# Altium PCB A313_4.PcbDoc (part 1 of 3)
Units mm, origin at the board's own origin, x right, y up, seen from the top; angles counter-clockwise.
Board outline 230 x 157 mm, 2 copper layers (Top Layer, Bottom Layer); 244 components, 187 nets, 1242 pads, 1093 vias.
Unrouted connection lines stored in the file: 1.
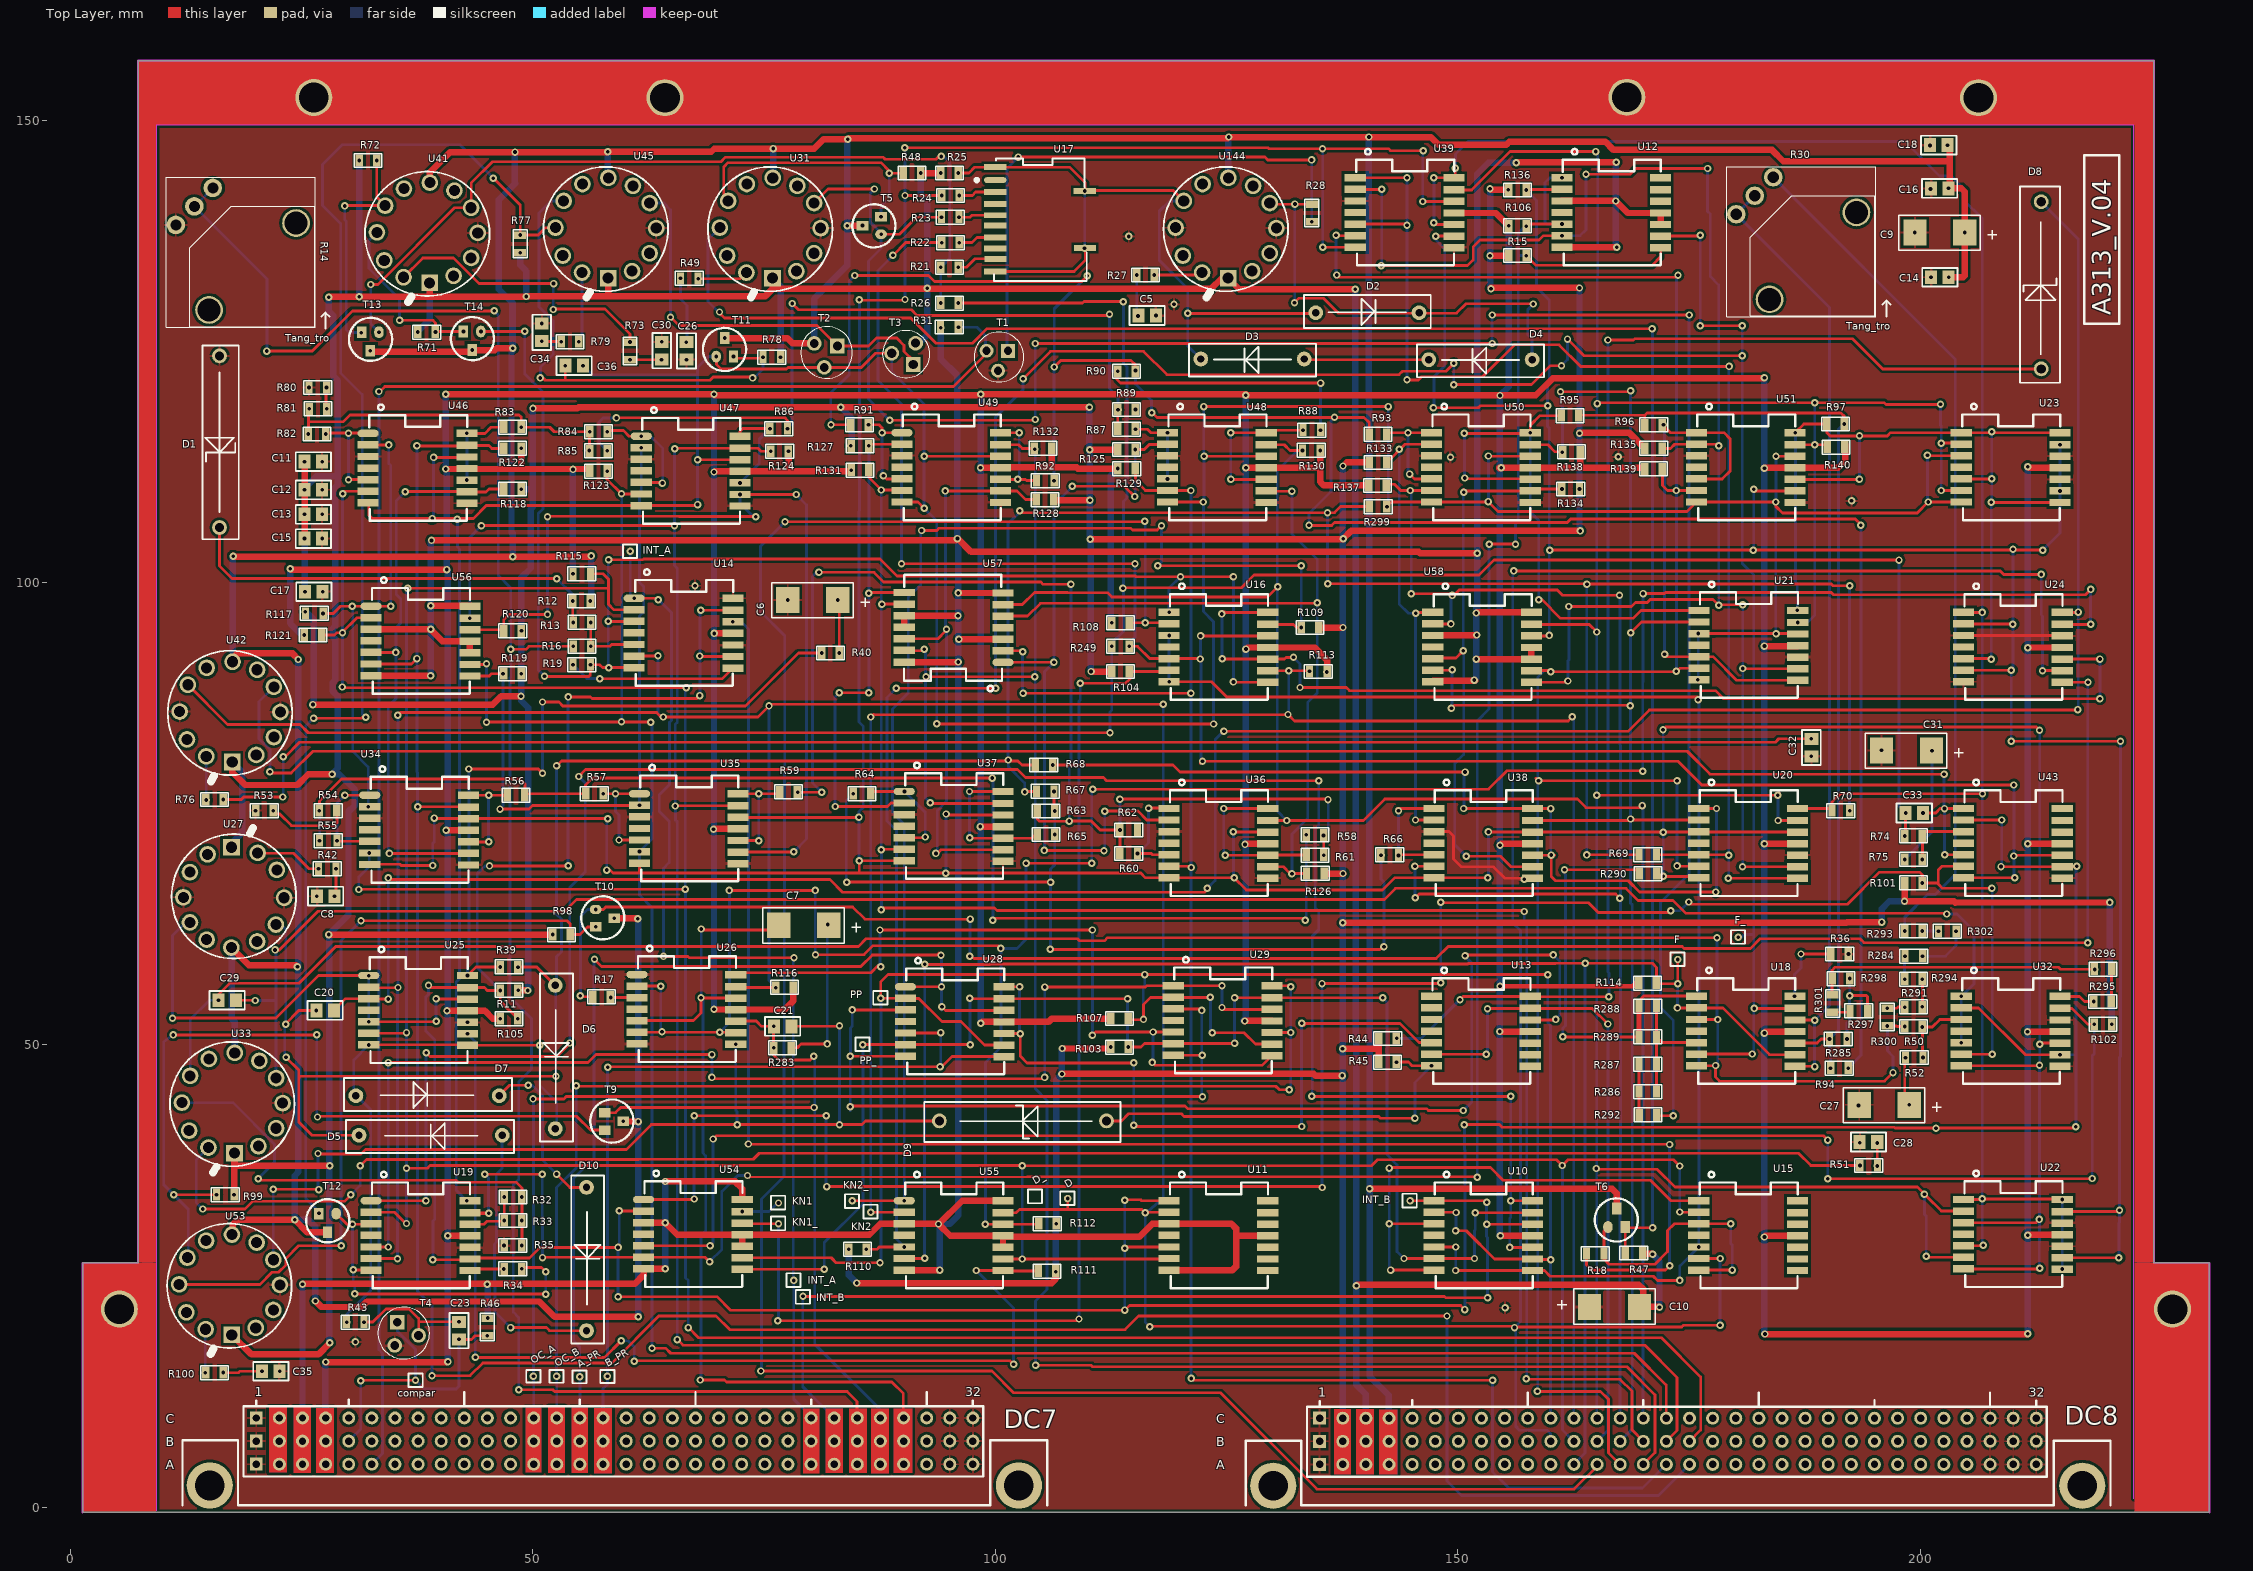
[diagram p0: Top Layer view]
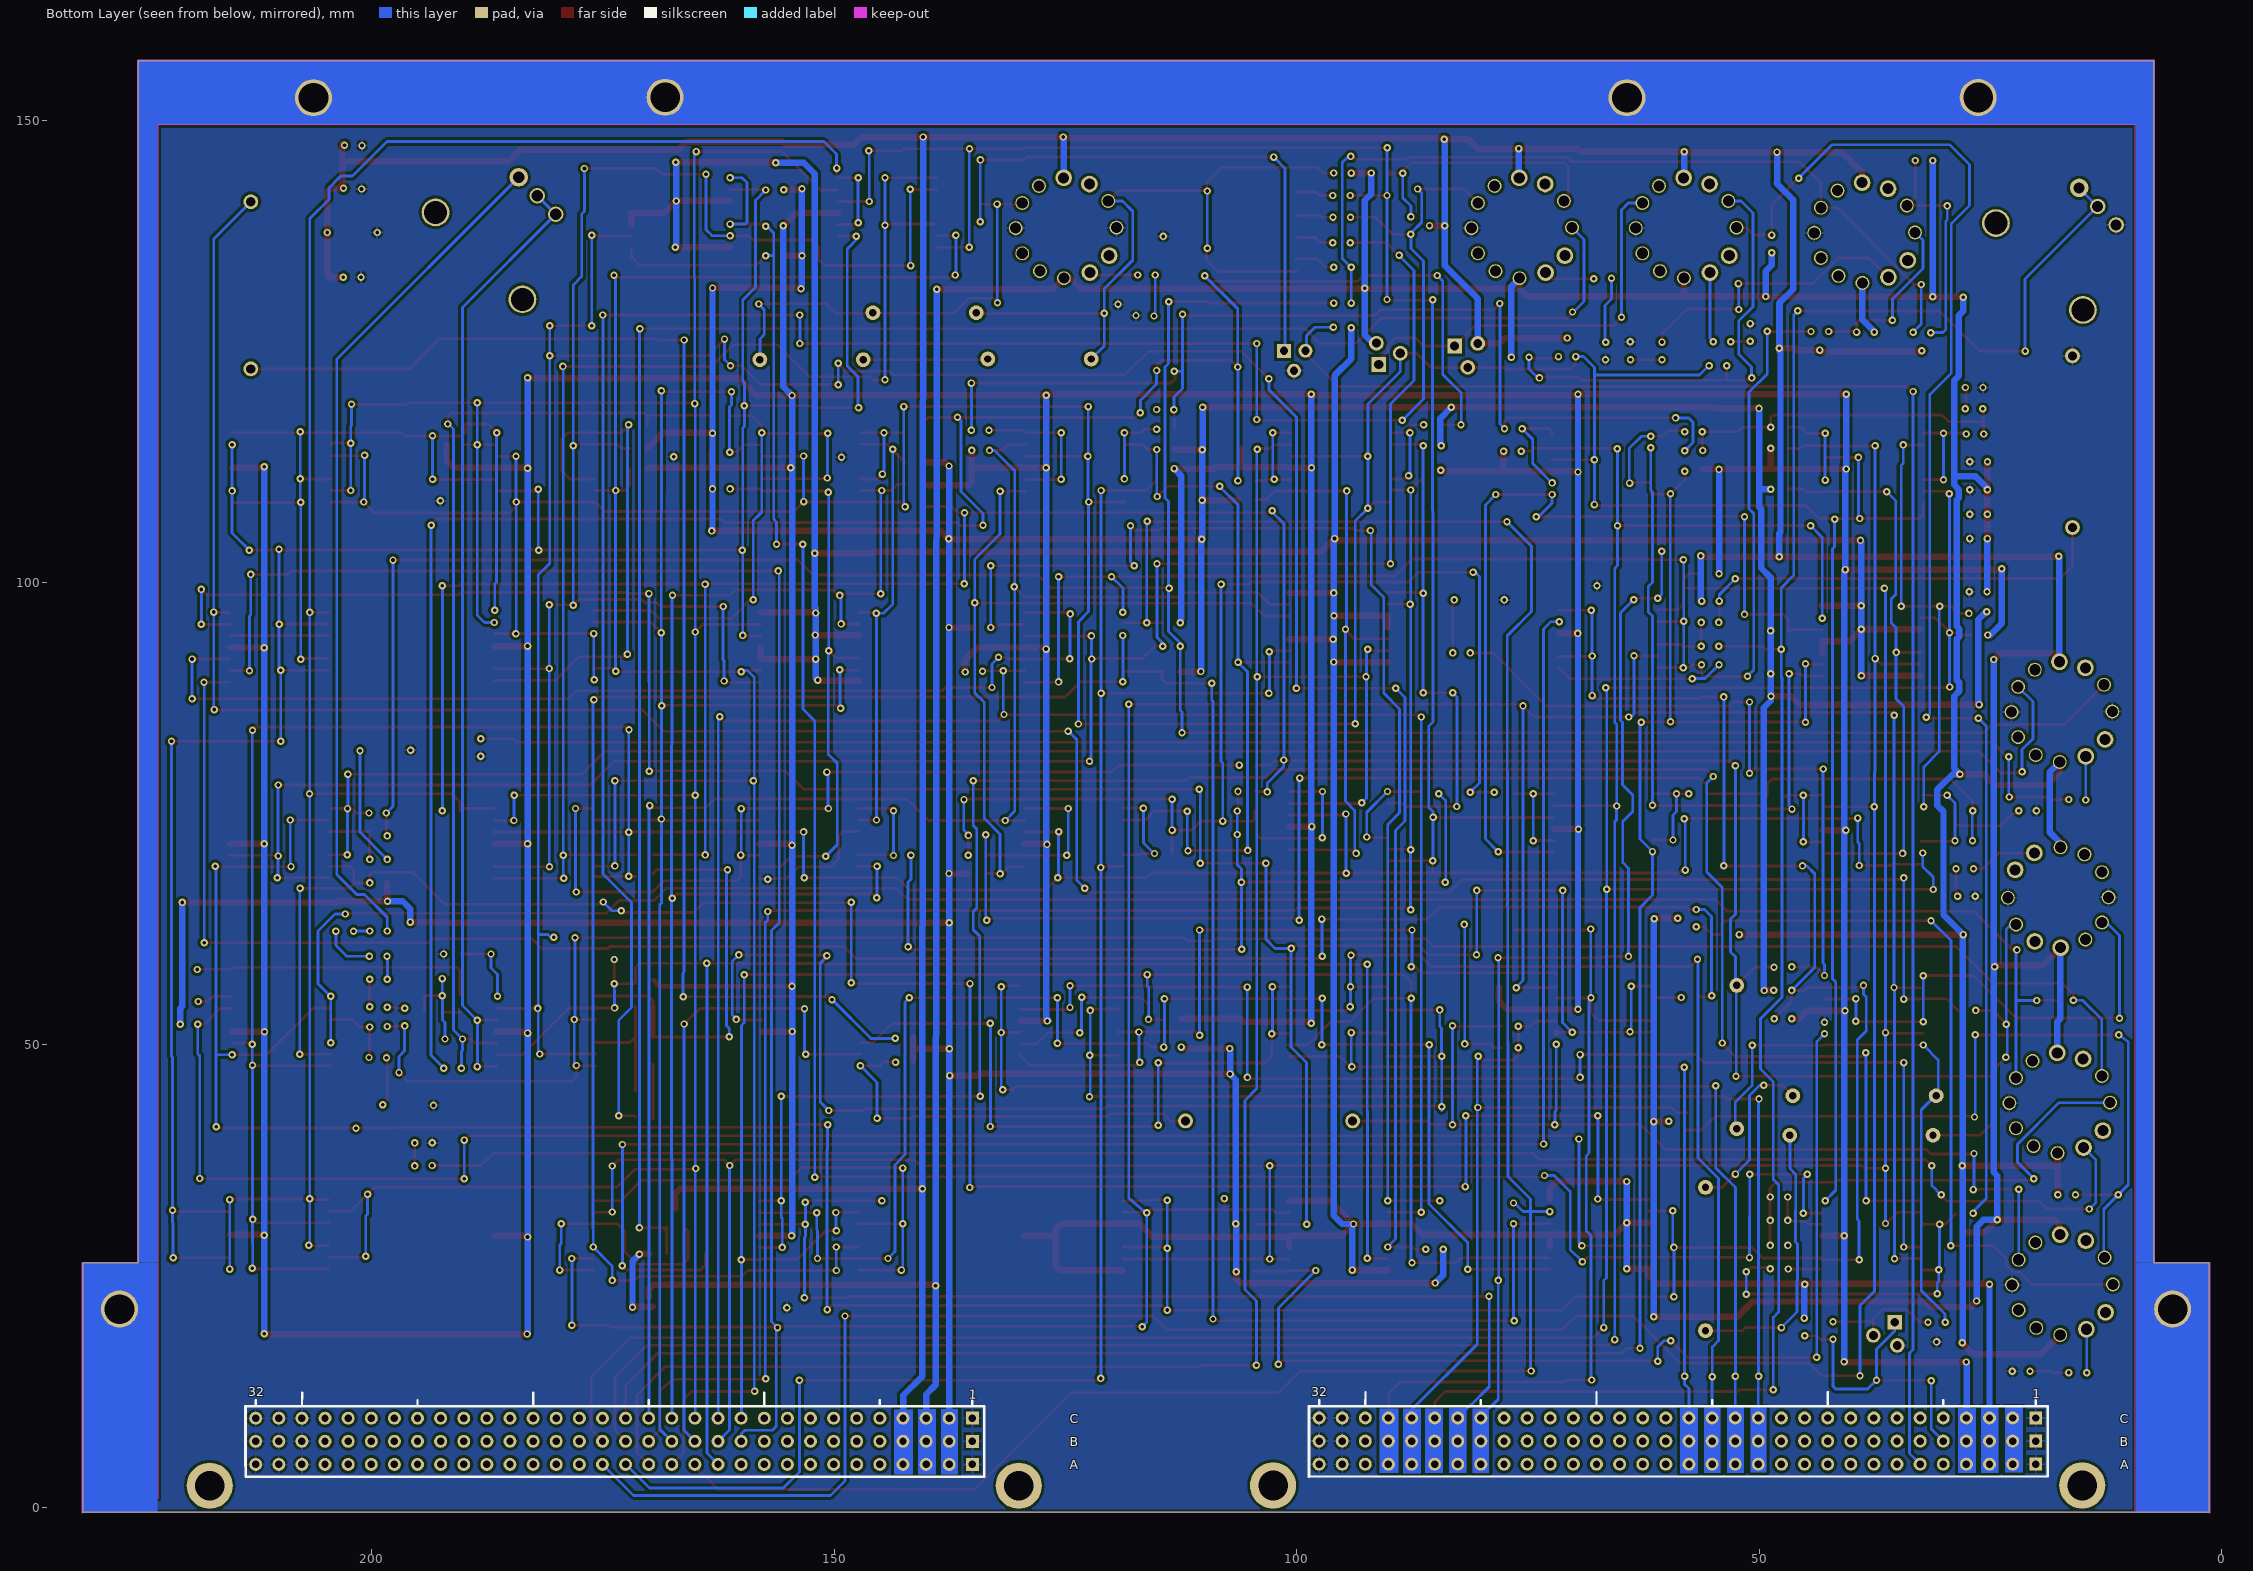
[diagram p1: Bottom Layer view, seen from below]

## Layer stack, top to bottom
Top Solder: solder mask 0.0102, Solder Resist, Dk 3.5
Top Layer: signal copper 0.0356
Dielectric1: dielectric 0.32, FR-4, Dk 4.8
Bottom Layer: signal copper 0.0356
Bottom Solder: solder mask 0.0102, Solder Resist, Dk 3.5

## Board outline
1.294,-0.56 1.294,26.44 7.294,26.44 7.294,156.44 225.294,156.44 225.294,26.44 231.294,26.44 231.294,-0.56

## Design rules (kind name [scope] priority, off if disabled: settings)
Clearance [All] p1: gap=0.3 ignorepadtopadclearanceinfootprint=FALSE except(0: Arc-Hole Track-Hole SMDPad-Hole THPad-Hole Via-Hole Fill-Hole Poly-Hole Region-Hole Text-Hole)
HoleSize [All] p1: absolutevalues=TRUE maxlimit=10 minlimit=0.025 maxpercent=80.000 minpercent=20.000
MinimumSolderMaskSliver [All] p1: minsoldermaskwidth=0
PolygonConnect [All] p1: connectstyle=Relief reliefconductorwidth=0.254 reliefentries=4 polygonreliefangle="90 Angle" airgapwidth=0.254
RoutingVias [All] p1: holewidth=0.4 width=0.8 viastyle="Through Hole" minholewidth=0.4 minwidth=0.8 maxholewidth=0.4 maxwidth=0.8
SilkToSilkClearance [All] p1: silktosilkclearance=0
SilkToSolderMaskClearance SilkscreenOverComponentPads [IsPad] p1: minsilkscreentomaskgap=0 clearancetoexposedcopper=TRUE
SolderMaskExpansion [All] p1: expansion=0.102
Width [All] p1: maxlimit=1 minlimit=0.3 preferedwidth=0.3 minimp=50.000000 maximp=50.000000 favimp=50.000000
26 further rules are at their usual default settings.

## Components (designator, comment, footprint, x,y, rotation, side; value= is the part's Value field where it differs from the comment)
C5 "3300pf" 0805 116.425,128.875 r180 top
C6 "10uf" 12 82.925,98.225 r180 top
C7 "10uf" 12 81.95,63.05 r180 top
C8 "3300pf" 0805 27.575,66.075 r180 top
C9 "22uf" 12 204.808,137.964 r180 top
C10 "22uf" 12 164.275,21.55 r0 top
C11 "0,01uf" 0805 26.246,113.072 r180 top
C12 "0,01uf" 0805 26.246,110.024 r180 top
C13 "0,01uf" 0805 26.25,107.375 r180 top
C14 "0,01uf" 0805 202.141,133.011 r180 top
C15 "0,01uf" 0805 26.25,104.75 r180 top
C16 "0,01uf" 0805 202.125,142.625 r180 top
C17 "0,01uf" 0805 26.3,99 r180 top
C18 "0,01uf" 0805 202.025,147.3 r180 top
C20 "18pf" 0805 27.525,53.725 r180 top
C21 "18pf" 0805 77,52 r0 top
C23 "270pf" 0805 42,19.1 r270 top
C26 "3300pf" 0805 66.6,125.05 r270 top
C27 "10U" 12 198.8,43.625 r180 top
C28 "3300pf" 0805 194.425,39.5 r180 top
C29 "22pf" 0805 16.925,54.825 r0 top
C30 "3300pf" 0805 63.925,125.075 r90 top
C31 "10U" 12 201.195,81.936 r180 top
C32 "3300pf" 0805 188.25,82.15 r270 top
C33 "22pf" 0805 199.375,75.075 r0 top
C34 "3300pf" 0805 50.95,127.05 r90 top
C35 "3300pf" 0805 21.65,14.7 r0 top
C36 "270pf" 0805 54.45,123.45 r0 top
D1 "D818E" D818E 16.15,114.325 r0 top
D2 "2D102A" D104 132.745,129.175 r0 top
D3 "2D102A" D104 135.306,124.175 r180 top
D4 "2D102A" D104 159.956,124.1 r180 top
D5 "D104" D_dai 46.675,40.225 r180 top
D6 "D104" D_dai 52.408,56.43 r270 top
D7 "D104" D_dai 30.85,44.5 r0 top
D8 "D814A" D814A 212.975,131.127 r0 top
D9 "D814A" D814A 104,41.65 r90 top
D10 "D104" D_dai 55.788,34.587 r270 top
DC7 "DC96c" DC96 18.135,3.334 r0 top locked
DC8 "DC96c" DC96 133.135,3.309 r0 top locked
R11 "10k" R0805 48.09,55.795 r90 top
R12 "220r" R0805 55.925,97.9 r90 top
R13 "2,43k/1%" R0805 54.625,95.775 r270 top
R14 "1,5k" RES_VAR_CP5_3_3 10.211,143.836 r270 top
R15 "10k" R0805 155.8,135.45 r270 top
R16 "1,82k/1%" R0805 55.964,93.006 r90 top
R17 "220r" R0805 56.726,55.287 r270 top
R18 "220r" R0805 165.55,27.325 r90 top
R19 "220r" R0805 54.6,91.2 r270 top
R21 "10k" R0805 94.375,134.175 r270 top
R22 "10k" R0805 94.475,136.85 r270 top
R23 "10k" R0805 94.45,139.6 r270 top
R24 "7,5k" R0805 94.475,141.95 r270 top
R25 "120k" R0805 95.715,144.187 r90 top
R26 "10k/1%" R0805 95.725,130.125 r90 top
R27 "56r" R0805 116.925,133.163 r90 top
R28 "1k" R0805 134.323,140.631 r180 top
R30 "Bientro" RES_VAR_CP5_3_3 178.961,144.986 r270 top
R31 "2,7k" R0805 94.35,127.725 r270 top
R32 "75k/1%" R0805 48.525,33.458 r90 top
R33 "1,8Mom/1%" R0805 48.525,30.918 r90 top
R34 "220r" R0805 47.15,25.875 r270 top
R35 "511r/1%" R0805 47.15,28.4 r270 top
R36 "4,7k" R0805 191.981,59.732 r90 top
R39 "220r" R0805 48.09,58.335 r90 top
R40 "100r" R0805 81.505,92.475 r270 top
R42 "56r" R0805 28.425,68.95 r90 top
R43 "1k" R0805 31.45,19.925 r90 top
R44 "3,92k" R0805 143.1,50.6 r90 top
R45 "3,92k" R0805 141.75,48.225 r270 top
R46 "680r" R0805 45.15,20.175 r180 top
R47 "1Mom" R0805 169.725,27.4 r90 top
R48 "1Mom" R0805 91.651,144.187 r90 top
R49 "56r" R0805 67.575,132.8 r90 top
R50 "220K" R0805 198.625,52.075 r270 top
R51 "56r" R0805 193.775,37.05 r270 top
R52 "100r" R0805 198.7,48.726 r270 top
R53 "5k/1%" R0805 21.625,75.225 r90 top
R54 "35k/1%" R0805 27.175,75.425 r270 top
R55 "40k/1%" R0805 27.184,72.178 r270 top
R56 "20k/1%" R0805 48.85,76.9 r90 top
R57 "10k/1%" R0805 55.964,77.258 r270 top
R58 "35k/1%" R0805 135.25,72.625 r90 top
R59 "40k/1%" R0805 78.316,77.258 r90 top
R60 "20k/1%" R0805 113.749,70.781 r270 top
R61 "10k/1%" R0805 135.25,70.425 r90 top
R62 "5k/1%" R0805 113.749,73.321 r270 top
R63 "35k/1%" R0805 106.151,75.192 r90 top
R64 "40k/1%" R0805 84.92,77.258 r270 top
R65 "20k/1%" R0805 106.151,72.652 r90 top
R66 "10k/1%" R0805 141.975,70.65 r270 top
R67 "35k/1%" R0805 104.725,77.5 r270 top
R68 "40k/1%" R0805 104.575,80.35 r270 top
R69 "20k/1%" R0805 169.883,70.654 r270 top
R70 "10k/1%" R0805 192.108,75.226 r90 top
R71 "1Mom" R0805 37.825,127.175 r270 top
R72 "1Mom" R0805 31.475,145.725 r270 top
R73 "56r" R0805 60.4,124.375 r0 top
R74 "220K" R0805 198.629,72.686 r270 top
R75 "100r" R0805 198.629,70.146 r270 top
R76 "56r" R0805 14.875,76.625 r270 top
R77 "1Mom" R0805 48.525,135.95 r0 top
R78 "1Mom" R0805 76.5,124.275 r90 top
R79 "56r" R0805 53.326,126.144 r270 top
R80 "5k/1%" R0805 27.4,121 r90 top
R81 "35k/1%" R0805 26.075,118.875 r270 top
R82 "40k/1%" R0805 25.975,116.15 r270 top
R83 "20k/1%" R0805 48.45,116.7 r90 top
R84 "10k/1%" R0805 56.4,116.4 r270 top
R85 "35k/1%" R0805 57.75,114.15 r90 top
R86 "40k/1%" R0805 77.25,116.55 r90 top
R87 "20k/1%" R0805 113.525,116.675 r270 top
R88 "10k/1%" R0805 134.9,116.375 r90 top
R89 "5k/1%" R0805 113.525,118.8 r270 top
R90 "35k/1%" R0805 114.85,122.75 r90 top
R91 "40k/1%" R0805 84.65,117.15 r270 top
R92 "20k/1%" R0805 106.075,110.925 r90 top
R93 "10k/1%" R0805 140.722,116.12 r270 top
R94 "35k/1%" R0805 190.601,47.568 r270 top
R95 "40k/1%" R0805 162.825,117.95 r90 top
R96 "20k/1%" R0805 170.518,117.136 r270 top
R97 "10k/1%" R0805 191.525,117.05 r90 top
R98 "1Mom" R0805 52.408,62.018 r270 top
R99 "1Mom" R0805 17.4,33.7 r90 top
R100 "56r" R0805 14.875,14.65 r270 top
R101 "10k" R0805 198.629,67.606 r270 top
R102 "10k" R0805 220.473,52.125 r90 top
R103 "10k" R0805 112.75,49.85 r270 top
R104 "10k" R0805 112.86,90.466 r270 top
R105 "330k" R0805 48.075,52.741 r90 top
R106 "330k" R0805 157.134,138.472 r90 top
R107 "330k" R0805 114.1,52.75 r90 top
R108 "330k" R0805 114.208,95.546 r90 top
R109 "10k" R0805 134.704,95.038 r90 top
R110 "10k" R0805 84.412,27.982 r270 top
R111 "10k" R0805 106.256,25.442 r90 top
R112 "10k" R0805 106.3,30.575 r90 top
R113 "330k" R0805 134.251,90.466 r270 top
R114 "330k" R0805 171.2,56.575 r90 top
R115 "330k" R0805 55.95,100.85 r90 top
R116 "330k" R0805 76.538,56.303 r270 top
R117 "10k" R0805 25.675,96.75 r270 top
R118 "10k" R0805 48.45,110.025 r90 top
R119 "10k" R0805 48.45,90.05 r90 top
R120 "10k" R0805 48.475,94.675 r90 top
R121 "330k" R0805 26.875,94.225 r90 top
R122 "330k" R0805 47.102,114.596 r270 top
R123 "330k" R0805 57.75,111.95 r90 top
R124 "330k" R0805 76,114.275 r270 top
R125 "10k" R0805 113.5,114.475 r270 top
R126 "10k" R0805 135.275,68.45 r90 top
R127 "10k" R0805 84.7,114.875 r270 top
R128 "10k" R0805 106.05,108.875 r90 top
R129 "330k" R0805 114.875,112.225 r90 top
R130 "330k" R0805 133.5,114.375 r270 top
R131 "330k" R0805 86.05,112.05 r90 top
R132 "330k" R0805 104.478,114.596 r270 top
R133 "10k" R0805 140.722,113.072 r270 top
R134 "10k" R0805 162.898,110.024 r90 top
R135 "10k" R0805 170.518,114.596 r270 top
R136 "10k" R0805 155.786,142.536 r270 top
R137 "330k" R0805 142,110.4 r90 top
R138 "330k" R0805 161.625,114.225 r270 top
R139 "330k" R0805 171.85,112.2 r90 top
R140 "330k" R0805 190.25,114.725 r270 top
R249 "10k/1%" R0805 114.208,93.006 r90 top
R283 "100r" R0805 76.3,49.775 r270 top
R284 "10k/1%" R0805 200,59.5 r90 top
R285 "32k/1%" R0805 190.484,50.725 r270 top
R286 "1,6k/1%" R0805 171.231,44.851 r90 top
R287 "10k/1%" R0805 171.231,47.809 r90 top
R288 "10k/1%" R0805 169.883,54.271 r270 top
R289 "1,6k/1%" R0805 169.883,50.954 r270 top
R290 "10k/1%" R0805 171.25,68.425 r90 top
R291 "7,725k/1%" R0805 198.625,54.2 r270 top
R292 "10k/1%" R0805 169.9,42.525 r270 top
R293 "1,5k" R0805 198.625,62.4 r270 top
R294 "10k/1%" R0805 198.629,57.192 r270 top
R295 "10k/1%" R0805 220.425,54.6 r90 top
R296 "10k/1%" R0805 219.125,58.275 r270 top
R297 "7,725k/1%" R0805 194.05,53.593 r90 top
R298 "5k/1%" R0805 192.125,57.075 r90 top
R299 "5k/1%" R0805 140.725,108.3 r270 top
R300 "7,725k/1%" R0805 196.375,52.325 r0 top
R301 "7,725k/1%" R0805 190.453,53.8 r0 top (schematic designator r301)
R302 "1,5k" R0805 202.275,62.375 r270 top
T1 "2T321B" 2T321B 100.4,125.275 r180 top
T2 "2T312B" TZT203G 81.5,124.625 r90 top
T3 "2T203g" t3 90.225,124.8 r180 top
T4 "2T301G" TZT203G 36.275,18.575 r180 top
T5 "C1815" C1815#1 87.925,138.625 r90 top
T6 "C1815" C1815#1 167.216,30.014 r0 top
T9 "C1815" C1815#2 57.488,41.698 r270 top
T10 "C1815" C1815#1 56.5,63.675 r270 top
T11 "C1815" C1815#1 70.775,124.15 r0 top
T12 "C1815" C1815#1 27.75,32.025 r180 top
T13 "C1815" C1815#1 32.375,127.35 r180 top
T14 "C1815" C1815#1 43.391,127.423 r180 top
U10 "168KT2b_4" 168KT2B-1#1 147.531,34.967 r0 top
U11 "168KT2V_4" 168KT2B-1#1 118.893,34.967 r0 top
U12 "168KT2V_4" 168KT2B-1#1 161.374,145.584 r0 top
U13 "168KT2b_4" 168KT2B-1#1 147.275,57.065 r0 top
U14 "168KT2b_4" 168KT2B-1#2 61.044,100.118 r0 top
U15 "168KT2b_4" 168KT2B-1#1 176.17,34.967 r0 top
U16 "168KT2b_4" 168KT2B-1#1 118.893,98.594 r0 top
U17 "2D908A" 2d908a 109.875,132.65 r90 top
U18 "168KT2b_4" 168KT2B-1#1 175.916,57.065 r0 top
U19 "168KT2b_4" 168KT2B-1#2 32.596,34.967 r0 top
U20 "168KT2b_4" 168KT2B-1#1 176.17,77.385 r0 top
U21 "168KT2b_4" 168KT2B-1#1 176.2,98.8 r0 top
U22 "168KT2b_4" 168KT2B-1#1 204.808,35.094 r0 top
U23 "168KT2b_4" 168KT2B-1#1 204.554,118.025 r0 top
U24 "168KT2b_4" 168KT2B-1#1 204.808,98.594 r0 top
U25 "168KT2b_4" 168KT2B-1#2 32.342,59.319 r0 top
U26 "168KT2b_4" 168KT2B-1#2 61.35,59.425 r0 top
U27 "140YD1B" 140YD 17.4,65.675 r180 top
U28 "168KT2b_4" 168KT2B-1#2 90.375,58.1 r0 top
U29 "168KT2b_4" 168KT2B-1#1 119.337,58.208 r0 top
U31 "140YD1B" 140YD 75.903,138.599 r0 top
U32 "168KT2b_4" 168KT2B-1#1 204.554,57.065 r0 top
U33 "140YD1B" 140YD 17.725,43.975 r0 top
U34 "168KT2B" 168KT2B-1#2 32.45,78.825 r0 top
U35 "168KT2B" 168KT2B-1#2 61.616,78.972 r0 top
U36 "168KT2B" 168KT2B-1#1 118.893,77.385 r0 top
U37 "168KT2B" 168KT2B-1#2 90.254,79.226 r0 top
U38 "168KT2B" 168KT2B-1#1 147.531,77.385 r0 top
U39 "168KT2B" 168KT2B-1#1 139.022,145.584 r0 top
U41 "140YD1B" 140YD 38.819,138.091 r0 top
U42 "140YD1B" 140YD 17.483,86.275 r0 top
U43 "168KT2b_4" 168KT2B-1#1 204.808,77.385 r0 top
U45 "140YD1B" 140YD 58.123,138.599 r0 top
U46 "168KT2B" 168KT2B-1#2 32.275,117.95 r0 top
U47 "168KT2B" 168KT2B-1#2 61.806,117.644 r0 top
U48 "168KT2B" 168KT2B-1#1 118.725,118.025 r0 top
U49 "168KT2B" 168KT2B-1#2 90,118.025 r0 top
U50 "168KT2B" 168KT2B-1#1 147.277,118.025 r0 top
U51 "168KT2B" 168KT2B-1#1 175.916,118.025 r0 top
U53 "140YD1B" 140YD 17.425,24.325 r0 top
U54 "168KT2b_4" 168KT2B-1#2 62.06,35.094 r0 top
U55 "168KT2b_4" 168KT2B-1#2 90.254,34.967 r0 top
U56 "168KT2b_4" 168KT2B-1#2 32.596,99.261 r0 top
U57 "168KT2b_4" 168KT2B-1#2 100.729,89.54 r180 top
U58 "168KT2b_4" 168KT2B-1#1 147.404,98.594 r0 top
U144 "140YD1B" 140YD 125.179,138.599 r0 top

## Footprints (in the part's own frame and the unit in brackets; to place one, negate y for a bottom-side part, rotate by r counter-clockwise, add the part's x,y. Pads: shape width x height; smd on the part's side, far side on the other; paste and mask are expansions set on the pad)
2d908a [mil]
  oval 25x95 smd: 1(427.83,389.13)
  rect 25x95 smd: 2(376.65,389.13) 3(325.48,389.13) 4(278.23,389.13) 5(234.93,389.13) 6(183.75,389.13) 7(136.5,389.13) 8(92.63,388.02) 9(38.36,389.08) 10(138.63,6.82) 11(381.16,8.12) 12(482.83,389.08)
  silkscreen extent -1,-1 520,394
2T321B [mm]
  rect 1.5x1.5 hole 0.9 mask+0.2: 1(-0.968,0.226)
  round 1.5 hole 0.9 mask+0.2: 2(0.107,2.367) 3(1.35,0.21)
  silkscreen extent -2.69,-1.8 2.69,3.58
12 [mm]
  rect 2.5x2.8 smd mask+0.15: 1(-0.03,0.111) 2(5.37,0.111)
  silkscreen extent -3.5,-1.75 7.1,2.05
140YD [mm]
  rect 1.8x1.8 / inner rect 1.8x1.8 / far side round 1.499 hole 1.2: 1(0,-5.69)
  round 1.8 / inner round 1.8 / far side round 1.499 hole 1.2: 2(2.59,-4.928) 3(4.495,-2.997) 4(5.207,-0.279) 5(4.495,2.438) 6(2.692,4.293) 9(-4.801,2.667) 10(-5.69,-0.229)
  round 1.8 hole 1.2: 7(0.025,5.156) 8(-2.769,4.496) 11(-4.903,-3.251) 12(-2.82,-5.08)
  silkscreen extent -6.98,-7.78 6.48,6.35
168KT2B-1#1 [mm]
  rect 2.286x0.8 smd: 1(-0.1,-1.824) 2(-0.1,-3.074) 3(-0.1,-4.324) 4(-0.1,-5.574) 5(-0.1,-6.824) 6(-0.1,-8.074) 7(-0.1,-9.324) 8(10.575,-9.374) 9(10.575,-8.124) 10(10.575,-6.874) 11(10.575,-5.624) 12(10.575,-4.374) 13(10.575,-3.124) 14(10.575,-1.824)
  silkscreen extent 0,-11.28 10.6,1.3
168KT2B-1#2 [mm]
  oval 2.286x0.8 smd: 1(-0.1,-1.824)
  rect 2.286x0.8 smd: 2(-0.1,-3.074) 3(-0.1,-4.324) 4(-0.1,-5.574) 5(-0.1,-6.824) 6(-0.1,-8.074) 7(-0.1,-9.324) 8(10.575,-9.374) 9(10.575,-8.124) 10(10.575,-6.874) 11(10.575,-5.624) 12(10.575,-4.374) 13(10.575,-3.124) 14(10.575,-1.824)
  silkscreen extent 0,-11.28 10.6,1.3
0805 [mm] "Chip Capacitor; Body 2.0 x 1.2 mm (LxW typ)"
  rect 1.3x1.5 smd: 1(-0.95,0) 2(0.95,0)
  silkscreen extent -1.91,-1.02 1.91,1.02
C1815#1 [mil]
  oval 40x50 smd: 1(-38.03,11.06)
  rect 40x50 smd: 2(-1.03,90.06) 3(35.97,11.06)
  silkscreen extent -94,-51 90,133
C1815#2 [mil]
  rect 40x50 smd: 1(-38.03,11.06) 2(-1.03,90.06) 3(35.97,11.06)
  silkscreen extent -94,-50 90,133
D104 [mm]
  round 1.6 hole 0.8: 1(1.905,0) 2(13.081,0)
  silkscreen extent 0.64,-1.65 14.35,1.91
D814A [mm]
  round 1.6 hole 1: 1(0.125,-8.025) 2(0.125,10.05)
  silkscreen extent -2.16,-9.53 2.16,11.68
D818E [mm]
  round 1.6 hole 1: 1(-0.045,10.182) 2(-0.045,-8.382)
  silkscreen extent -1.91,-9.65 2.03,11.3
D_dai [mm]
  round 1.6 hole 0.8: 1(0,0) 2(15.494,0)
  silkscreen extent -1.27,-1.65 16.89,1.91
DC96 [mm]
  round 5 hole 3.2: A(-3.085,-0.984) B(84.415,-0.984)
  rect 1.4x1.4 hole 0.8: A1(1.94,1.316) B1(1.94,3.816) C1(1.94,6.316)
  round 1.4 hole 0.8: A2(4.44,1.316) A3(6.94,1.316) A4(9.44,1.316) A5(11.94,1.316) A6(14.44,1.316) A7(16.94,1.316) A8(19.44,1.316) A9(21.94,1.316) A10(24.44,1.316) A11(26.94,1.316) A12(29.44,1.316) A13(31.94,1.316) A14(34.44,1.316) A15(36.94,1.316) A16(39.44,1.316) A17(41.94,1.316) A18(44.44,1.316) A19(46.94,1.316) A20(49.44,1.316) A21(51.94,1.316) A22(54.44,1.316) A23(56.94,1.316) A24(59.44,1.316) A25(61.94,1.316) A26(64.44,1.316) A27(66.94,1.316) A28(69.44,1.316) A29(71.94,1.316) A30(74.44,1.316) A31(76.94,1.316) A32(79.44,1.316) B2(4.44,3.816) B3(6.94,3.816) B4(9.44,3.816) B5(11.94,3.816) B6(14.44,3.816) B7(16.94,3.816) B8(19.44,3.816) B9(21.94,3.816) B10(24.44,3.816) B11(26.94,3.816) B12(29.44,3.816) B13(31.94,3.816) B14(34.44,3.816) B15(36.94,3.816) B16(39.44,3.816) B17(41.94,3.816) B18(44.44,3.816) B19(46.94,3.816) B20(49.44,3.816) B21(51.94,3.816) B22(54.44,3.816) B23(56.94,3.816) B24(59.44,3.816) B25(61.94,3.816) B26(64.44,3.816) B27(66.94,3.816) B28(69.44,3.816) B29(71.94,3.816) B30(74.44,3.816) B31(76.94,3.816) B32(79.44,3.816) C2(4.44,6.316) C3(6.94,6.316) C4(9.44,6.316) C5(11.94,6.316) C6(14.44,6.316) C7(16.94,6.316) C8(19.44,6.316) C9(21.94,6.316) C10(24.44,6.316) C11(26.94,6.316) C12(29.44,6.316) C13(31.94,6.316) C14(34.44,6.316) C15(36.94,6.316) C16(39.44,6.316) C17(41.94,6.316) C18(44.44,6.316) C19(46.94,6.316) C20(49.44,6.316) C21(51.94,6.316) C22(54.44,6.316) C23(56.94,6.316) C24(59.44,6.316) C25(61.94,6.316) C26(64.44,6.316) C27(66.94,6.316) C28(69.44,6.316) C29(71.94,6.316) C30(74.44,6.316) C31(76.94,6.316) C32(79.44,6.316)
  silkscreen extent -6.03,-3.11 87.47,9.09
R0805 [mm]
  rect 1.3x0.8 smd: 1(0.093,1.624) 2(0.093,-0.276)
  silkscreen extent -0.66,-0.83 0.84,2.17
RES_VAR_CP5_3_3 [mm]
  round 2 hole 1.2: 1(1.161,5.164)
  round 2 / inner oval 2x1.524 / far side round 1.651 hole 1.2: 2(3.161,3.164) 3(5.161,1.164)
  round 3 hole 2.5: 4(4.961,14.164) 5(14.361,4.764)
  silkscreen extent 0,0.13 16.26,16.26
t3 [mm]
  rect 1.6x1.6 hole 1 mask+0.2: 1(-0.895,1.226)
  round 1.6 hole 1 mask+0.2: 2(1.435,0.004)
  round 1.6 hole 0.965 mask+0.2: 3(-1.157,-1.078)
  silkscreen extent -2.69,-2.45 2.43,2.66
TZT203G [mil]
  rect 62x62 hole 38 mask+5: 1(37.4,-56.1)
  round 62 hole 38 mask+5: 2(48.33,42.67) 3(-53.69,0.09)
  silkscreen extent -100,-120 120,100

## Part data
C5 C8 C11 C12 C13 C14 C15 C16 C17 C18 C20 C21 C23 C26 C28 C29 C30 C32 C33 C34 C35 C36: library part "CAP NP"
C6: library part C_0
C7 C9 C10: library part C
C27 C31: library part "CAP POL"
D1 D9: library part "DIODE ZENER"
D2 D3 D4 D5 D6 D7 D10: library part DIODE
D8: library part "DIODE ZENER_0"
R11 R12 R13 R15 R16 R17 R18 R19 R21 R22 R23 R24 R25 R26 R27 R28 R31 R32 R33 R34 R35 R36 R39 R40 R42 R43 R44 R45 R46 R47 R48 R49 R50 R51 R52 R53 R54 R55 R56 R57 R58 R59 R60 R61 R62 R63 R64 R65 R66 R67 R68 R69 R70 R71 R72 R73 R74 R75 R76 R77 R78 R79 R80 R81 R82 R83 R84 R85 R86 R87 R88 R89 R90 R91 R92 R93 R94 R95 R96 R97 R98 R99 R100 R101 R102 R103 R104 R105 R106 R107 R108 R109 R110 R111 R112 R113 R114 R115 R116 R117 R118 R119 R120 R121 R122 R123 R124 R125 R126 R127 R128 R129 R130 R131 R132 R133 R134 R135 R136 R137 R138 R139 R140 R249 R283 R284 R285 R286 R287 R288 R289 R290 R291 R292 R293 R294 R295 R296 R297 R298 R299 R300 R301 R302: library part R
R14 R30: library part "RESISTOR VAR"
T1: library part 1R1001_4
T2: library part 1R1001_2
T3: library part 2N1132_1
T4: library part 1R1001_5
T5 T6 T9 T10 T11 T12 T13 T14: library part 1R1001_1
U11 U54 U55 U56 U57 U58: library part 168KT2b_25
U12: library part 168KT2b_17
U13: library part 168KT2b_23
U17: library part 2D908A_1
U27 U31 U33 U45 U53 U144: library part 140YD1B_2
U34 U35 U36 U37 U38 U39 U46 U47 U48 U49 U50 U51: library part 168KT2B_13
U41: library part 140YD1B_3
U42: library part 140YD1B_4

## Free pads (board coordinates)
  round 4 hole 3.2: 0(5.275,21.425) 0(26.3,152.45) 0(64.275,152.425) 0(168.3,152.475) 0(206.325,152.425) 0(227.3,21.425)
  round 0.8 hole 0.4: 2(60.525,103.374) 2(107.825,33.375) 2(173.8,59.225) 2(198.83,43.514)

## Via types
v1: diameter 0.8, hole 0.4, Top Layer to Bottom Layer, 1092 vias
v2: diameter 0.8, hole 0.4, Top Layer to Bottom Layer, tented top, 1 vias

## Nets (pads, with @x,y where several pads share a name; then routed paths per layer and width w, separated by ;. In a path a pad name is that pad's centre, name@x,y a point inside that pad or via, vN(x,y) a via of type N, cw(c..) or ccw(c..) an arc to the next point about the centre after c; other vN are vias at no path point)
4P: DC8.C13 R140.2 U20.13 U21.13 U22.2 U22.6 U23.2 U23.6 U39.13 U51.13 U58.13 | length 319.1
  Top Layer w0.3: U39.13@149.597,142.46 151.51,142.46 155.65,146.6 v1(164.925,146.6) ; U58.13@157.979,95.47 164.23,95.47 v1(165.05,94.65) ; v1@165.05,36.55 171.575,36.55 173.506,34.619 199.706,34.619 v1(200.475,33.85) ; v1(165.05,77) v1(184.6,77) v1@184.775,77 ; v1(165.1,119.35) 165.2,119.45 v1(188.625,119.45) 196.125,119.45 196.312,119.263 v1(202.212,119.263) ; v1(184.65,74.261) U20.13@186.744,74.261 ; v1@184.725,77.3 184.825,77.2 184.825,77.05 v1@184.775,77 ; v1@184.825,77 v1@184.775,77 ; U51.13@186.49,114.901 v1(188.625,114.901) 189.993,114.901 R140.2@189.999,114.907 ; v1(200.675,27.125) 200.78,27.02 U22.6@204.708,27.02 ; v1@200.7,33.625 202.305,32.02 U22.2@204.708,32.02 ; v1@202.051,109.951 v1(202.3,109.951) U23.6@204.454,109.951 ; v1(202.3,115.075) 204.33,115.075 U23.2@204.454,114.951
  Bottom Layer w0.3: DC8.C13@165.05,9.625 v1(165.05,77) 165.05,119.1 v1@165.175,119.225 ; v1(165.1,119.35) v1@165.15,146.475 ; v1(184.6,77) v1@184.65,77 ; v1(184.65,74.261) v1@184.65,77 ; v1(186.775,95.676) 187.826,95.676 188.625,96.475 v1(188.625,114.901) v1(188.625,119.45) ; v1(200.475,33.85) 200.475,31.675 200.675,31.475 v1(200.675,27.125) ; v1@202.125,119.35 v1(202.212,119.263) 202.212,117.013 202.3,116.925 v1(202.3,115.075) v1(202.3,109.951) ; v1@184.65,77 184.65,77.225 184.675,77.25 184.775,77.25 184.825,77.2 184.825,77.05 184.775,77 v1@184.65,77
  other v1: 165,36.625
4P_: R136.1 U12.2 U22.9 U22.13 U23.9 U23.13 U24.2 U24.6 U39.9 U51.9 U58.12 | length 276.5
  Top Layer w0.3: v1(147.375,118.9) 152.225,118.9 152.45,119.125 v1(159.725,119.125) ; v1(147.64,137.46) U39.9@149.597,137.46 ; R136.1@157.477,142.51 U12.2@161.274,142.51 ; U58.12@157.979,94.22 v1@159.845,94.22 ; v1(159.95,103.5) v1(181.975,103.5) v1(213.275,103.5) ; v1@182.051,109.901 U51.9@186.49,109.901 ; U24.6@204.708,90.52 v1(209.87,90.52) ; U24.2@204.708,95.52 v1@209.905,95.52 ; v1(209.87,82.825) v1(221.675,82.825) ; v1(210.025,95.5) 210.025,95.525 v1@210.125,95.625 ; U22.9@215.383,26.97 v1(221.505,26.97) ; U22.13@215.383,31.97 v1@221.545,31.97
  Bottom Layer w0.3: v1(147.375,118.9) 147.425,118.95 147.425,122.25 148.6,123.425 148.6,136.071 v1@147.425,137.246 ; v1(157.41,142.443) 158.525,141.328 158.525,131.925 159.9,130.55 159.9,121.775 159.725,121.6 v1(159.725,119.125) 159.725,116.9 159.9,116.725 v1(159.9,94.275) ; v1@182.025,103.55 v1(182.025,110.075) ; v1(209.87,82.825) v1(209.87,90.52) ; v1@210.025,90.52 210.05,90.545 v1(210.05,103.6) ; v1(213.275,103.5) 215.129,105.354 v1(215.129,109.901) v1(215.129,114.901) ; v1(221.505,26.97) 221.505,30.705 221.575,30.775 v1(221.575,32.1) 221.575,48.65 221.675,48.75 v1(221.675,82.825)
5P: DC8.A14 R139.2 U20.6 U21.6 U39.6 U51.6 U58.9 | length 232.9
  Top Layer w0.3: v1@136.85,133 173.6,133 v1(173.825,133.225) ; v1(136.85,137.55) 136.89,137.51 U39.6@138.922,137.51 ; U58.9@157.979,90.47 159.93,90.47 v1(160.05,90.35) 173.651,90.35 174.028,90.726 U21.6@175.864,90.726 ; v1@158.4,12.525 v1(158.625,12.525) 165.45,12.525 166.3,11.675 166.3,5.875 DC8.A14@167.55,4.625 ; v1@158.475,78.825 v1(158.75,78.55) v1(173.725,78.55) ; R139.2@172.126,112.293 172.142,112.277 172.142,110.5 172.691,109.951 v1(173.651,109.951) U51.6@175.816,109.951 ; v1(173.725,69.35) 173.764,69.311 U20.6@176.07,69.311 ; U21.6@176.07,90.52 U21.6@175.864,90.726 ; U21.6@176.1,90.726 U21.6@175.864,90.726
  Bottom Layer w0.3: v1@136.85,133 v1(136.85,137.55) ; v1@158.625,78.8 158.633,78.546 158.65,78.05 ; v1@158.65,12.575 158.65,26.605 158.65,78.05 ; v1@159.875,90.475 159.4,90.475 158.65,89.725 158.65,78.05 ; v1@173.651,90.601 v1(173.651,109.951) v1@173.651,133.174 ; v1(173.725,69.35) v1(173.725,78.55) v1@173.825,78.65
  other v1: 173.651,90.4 136.925,133.25
5P_: R135.1 U12.6 U20.9 U21.9 U39.2 U51.2 U58.8 | length 180.1
  Top Layer w0.3: U39.2@138.922,142.51 v1@141.79,142.51 ; v1(141.75,134.275) 151.061,134.275 151.675,134.889 151.675,136.3 152.4,137.025 158.8,137.025 159.285,137.51 v1(161.274,137.51) ; U58.8@157.979,89.22 v1@161.77,89.22 ; v1(162.025,97.4) 168.8,97.4 169.226,97.826 170.507,97.826 170.831,98.15 177.625,98.15 v1(178.225,97.55) ; v1(163.875,144.15) 168.65,144.15 169.275,144.775 v1(177.025,144.775) ; R135.1@172.142,114.503 173.027,114.503 173.475,114.951 U51.2@175.816,114.951 v1@178.074,114.951 ; v1@178.225,97.6 v1(180.825,97.6) ; v1@181.025,69.2 181.086,69.261 U20.9@186.744,69.261 U20.9@186.631,69.375 ; v1@181.149,90.676 U21.9@186.775,90.676
  Bottom Layer w0.3: v1@141.79,134.315 v1(141.79,142.529) ; v1(161.274,137.51) 163.235,137.51 163.875,138.15 v1(163.875,144.15) ; v1(161.925,89.35) 161.925,91.55 162.025,91.65 v1(162.025,97.4) ; v1(177.025,144.775) 177.025,140.15 177.325,139.85 177.325,133.075 178.225,132.175 v1(178.225,114.8) ; v1(178.225,97.55) v1(178.225,114.8) ; v1@178.325,114.9 v1(178.225,114.8) ; v1@180.825,69.275 v1(180.825,90.7) v1(180.825,97.6)
  other v1: 180.8,69.25
6P: DC8.B14 R138.2 U20.2 U21.2 U38.13 U50.13 U58.6 | length 182.9
  Top Layer w0.3: U58.6@147.304,90.52 149.13,90.52 v1@149.2,90.45 ; 149.65,86.725 v1@168.65,86.725 ; U50.13@157.852,114.901 159.774,114.901 160.543,114.132 R138.2@161.349,114.132 ; U38.13@158.106,74.261 v1@168.536,74.261 ; v1(161.125,120.625) v1@168.675,120.625 ; v1(168.725,94.575) 169.876,95.726 U21.2@176.1,95.726 ; v1@168.814,74.311 U20.2@176.07,74.311
  Bottom Layer w0.3: v1(149.325,86.4) 149.4,86.475 v1(149.4,90.575) ; v1(161.125,120.625) 161.125,119.2 161.325,119 v1(161.325,114.1) ; DC8.B14@167.55,7.125 DC8.B14@167.563,7.137 ; DC8.B14@167.575,7.125 168.875,8.425 168.875,10.276 168.875,65.15 168.7,65.325 v1(168.7,74.425) v1@168.7,94.575 ; v1(168.7,120.725) v1(168.725,94.575)
  other v1: 168.65,86.675
6P_: R134.1 U38.9 U50.9 U58.5 | length 62.8
  Top Layer w0.3: U58.5@147.304,91.77 147.359,91.825 149.8,91.825 v1(150.6,92.625) ; v1@150.65,110.075 150.824,109.901 U50.9@157.852,109.901 158.068,110.117 v1(161.274,110.117) ; v1(150.925,70.4) 154.636,70.4 155.775,69.261 U38.9@158.106,69.261
  Bottom Layer w0.3: v1@150.65,110.075 150.6,110.025 v1(150.6,92.625) 150.45,92.475 150.65,92.275 150.65,81.411 149.689,80.45 149.689,71.636 v1(150.925,70.4)
  other v1: 150.65,109.75
7P: DC8.C14 R137.2 U38.6 U50.6 U58.2 | length 160.3
  Top Layer w0.3: R137.2@142.346,110.625 143.175,110.625 143.849,109.951 v1(144.875,109.951) U50.6@147.177,109.951 ; v1(144.975,98.775) v1@149.25,98.775 ; v1(145.375,69.3) 145.386,69.311 U38.6@147.431,69.311 ; v1(145.425,65.9) 145.85,66.325 167.083,66.325 v1(167.541,65.866) ; U58.2@147.304,95.52 v1(149.27,95.52) ; v1@149.4,98.625 149.6,98.625 150.175,99.2 160.765,99.2 161.34,98.625 v1(167.5,98.625)
  Bottom Layer w0.3: v1(144.975,98.775) v1@144.975,109.851 ; v1(145.375,69.3) 145.375,66.2 v1@145.425,66.15 ; v1(149.27,95.52) v1@149.27,98.52 ; DC8.C14@167.55,9.625 v1@167.6,65.866 ; v1@167.55,98.625 v1@167.6,66.25
  other v1: 149.4,98.6
7P_: R133.1 U38.2 U50.2 U58.1 | length 50.9
  Top Layer w0.3: R133.1@142.346,112.979 144.318,114.951 U50.2@147.177,114.951 ; v1(145.436,74.311) U38.2@147.431,74.311 ; v1@145.45,96.77 U58.1@147.304,96.77
  Bottom Layer w0.3: v1(143.675,114.425) 143.675,97.675 144.675,96.675 v1(145.45,96.675) ; v1(145.436,74.311) 145.436,96.611 v1@145.55,96.725
8P: DC8.A15 R132.2 U37.13 U49.13 U57.13 | length 218.8
  Top Layer w0.3: U57.13@90.154,92.664 90.193,92.625 v1@92.125,92.625 ; v1(92.5,89.8) v1(104.275,89.8) ; v1(92.95,76.175) 93.022,76.103 U37.13@100.829,76.103 ; U49.13@100.575,114.901 102.525,114.901 102.923,114.503 R132.2@104.202,114.503 ; v1(104.35,15.35) 110.359,15.35 110.525,15.184 168.291,15.184 171.325,12.15 171.325,5.9 DC8.A15@170.05,4.625
  Bottom Layer w0.3: v1(92.3,92.775) 92.45,92.625 92.45,76.675 v1(92.95,76.175) ; v1(104.25,114.425) 104.325,114.35 104.325,45.25 105.6,43.975 105.6,23.55 104.35,22.3 v1(104.35,15.35)
8P_: R128.1 U37.9 U49.9 U57.12 | length 62
  Top Layer w0.3: U57.12@90.154,93.914 93.789,93.914 v1@94.625,94.75 ; v1@93.775,70.75 94.128,71.103 U37.9@100.829,71.103 ; v1(94.6,109.901) U49.9@100.575,109.901 102.324,109.901 103.257,108.968 R128.1@104.426,108.968
  Bottom Layer w0.3: v1@93.65,70.675 93.726,70.751 93.726,75.362 94.725,76.36 v1(94.725,94.95) 94.6,95.075 v1(94.6,109.901)
  other v1: 93.575,70.7
9P: DC8.B15 R131.2 U37.6 U49.6 U57.9 | length 193.3
  Top Layer w0.3: R131.2@86.326,112.143 86.326,111.349 v1(87.675,110) 89.851,110 U49.6@89.9,109.951 ; v1(87.65,64.625) 87.675,64.6 87.875,64.8 99.923,64.8 100.198,64.525 v1@157.193,64.525 ; v1(87.736,97.664) U57.9@90.154,97.664 ; v1@87.978,71.153 U37.6@90.154,71.153 ; v1@157.193,64.4 157.35,64.4 v1(157.193,64.425) ; v1@157.425,13.825 167.575,13.825 168.85,12.55 168.85,8.375 170.05,7.175 DC8.B15@170.05,7.125
  Bottom Layer w0.3: v1(87.675,71.1) v1(87.675,110) ; v1@87.7,64.875 v1@87.7,71.1 ; v1(157.193,64.425) 157.193,63.482 157.475,63.2 v1@157.475,13.875
  other v1: 157.425,13.875
9P_: R127.1 U37.2 U49.2 U57.8 | length 57.1
  Top Layer w0.3: v1(82.675,75.775) 88.35,75.775 88.728,76.153 U37.2@90.154,76.153 ; v1@83.425,88.075 v1(86.325,88.075) ; v1(86.324,114.782) 86.493,114.951 U49.2@89.9,114.951 ; v1@86.387,98.914 U57.8@90.154,98.914
  Bottom Layer w0.3: v1(82.675,75.775) 82.675,87.625 v1(83.125,88.075) ; v1(86.325,88.075) v1(86.324,98.851) v1(86.324,114.782)
10P: DC8.C15 R130.2 U36.13 U48.13 U57.6 | length 185.6
  Top Layer w0.3: U57.6@100.829,97.614 102.914,97.614 104.225,98.925 107.777,98.925 107.802,98.9 112.125,98.9 112.6,98.425 129.425,98.425 v1(130.55,99.55) ; U48.13@129.3,114.901 131.249,114.901 131.868,114.282 v1(133.224,114.282) ; U36.13@129.467,74.261 v1(131.5,74.261) 139.811,74.261 142.125,76.575 162.95,76.575 163.875,75.65 169.9,75.65 v1@170.1,75.85
  Bottom Layer w0.3: v1(131.5,74.261) 130.5,75.261 130.5,112.1 132.682,114.282 v1(133.224,114.282) ; DC8.C15@170.05,9.625 v1@170.05,76.175
  other v1: 169.975,75.875
10P_: R126.1 U36.9 U48.9 U57.5 | length 85.7
  Top Layer w0.3: U57.5@100.829,96.364 103.489,96.364 104.875,97.75 135.025,97.75 v1@135.05,97.775 ; U48.9@129.3,109.901 129.326,109.875 v1(132.075,109.875) ; U36.9@129.467,69.261 131.164,69.261 131.882,68.543 R126.1@133.651,68.543
  Bottom Layer w0.3: v1(132.075,68.5) 132.075,72.775 133.775,74.475 133.775,87.025 134.825,88.075 134.825,100.453 134.825,102.475 132.075,105.225 v1(132.075,109.875)
  other v1: 134.825,97.8
11P: DC8.A16 R129.2 U36.6 U48.6 U57.2 | length 194
  Top Layer w0.3: U57.2@100.829,92.614 102.661,92.614 v1@102.675,92.6 ; v1(103,88.025) v1(121.15,88.025) v1@121.175,88.05 ; R129.2@115.151,112.318 115.151,111.024 116.224,109.951 U48.6@118.625,109.951 v1(121.151,109.951) ; U36.6@118.793,69.311 121.039,69.311 v1(121.175,69.175) ; v1(121.175,13.925) 121.375,13.725 v1(153.775,13.725)
  Bottom Layer w0.3: v1(102.95,92.525) 102.95,88.075 v1(103,88.025) ; v1@121.1,69.25 v1(121.175,69.175) ; v1(121.175,13.925) v1(121.175,69.175) ; v1@121.2,109.95 121.175,109.925 v1(121.175,69.175) ; v1(153.775,13.725) 153.775,3.825 155.525,2.075 170,2.075 DC8.A16@172.55,4.625
11P_: R125.1 U36.2 U48.2 U57.1 | length 79.7
  Top Layer w0.3: U57.1@100.829,91.364 v1(106.336,91.364) ; v1(105.3,71.025) 111.725,71.025 v1(111.75,71) ; v1(108.325,110.4) 113.975,110.4 v1(115.075,109.3) ; v1(111.825,75.275) 115.425,75.275 116.372,74.328 118.776,74.328 U36.2@118.793,74.311 ; v1(115.124,114.382) 116.107,114.382 116.65,114.925 118.599,114.925 U48.2@118.625,114.951
  Bottom Layer w0.3: v1@105.5,71.15 105.325,71.325 105.325,90.352 v1(106.336,91.364) 106.336,108.411 v1(108.325,110.4) ; v1@111.825,71.325 v1(111.825,75.275) ; v1(115.124,114.382) 115.124,109.551 v1@115.2,109.475
12P: DC8.B16 R124.2 U35.13 U47.13 U56.13 | length 262.6
  Top Layer w0.3: v1(44.425,106.15) v1(65.3,106.15) ; v1(65.325,114.45) 65.395,114.52 U47.13@72.381,114.52 74.35,114.52 74.688,114.182 v1(75.724,114.182) ; v1@65.375,75.75 65.384,75.751 65.482,75.849 U35.13@72.19,75.849 ; v1@65.6,18.15 66.225,17.525 170.225,17.525 173.725,14.025 173.725,8.3 DC8.B16@172.55,7.125
  Bottom Layer w0.3: v1(43.171,96.137) 43.171,104.896 v1(44.425,106.15) ; v1(65.325,114.45) 65.3,114.425 v1(65.3,106.15) 65.3,101.825 65.6,101.525 65.6,84.854 65.375,84.629 v1(65.375,75.825) ; v1@65.425,75.725 65.425,74.3 65.6,74.125 v1(65.6,18.125)
12P_: R120.1 U35.9 U47.9 U56.12 | length 98.3
  Top Layer w0.3: U56.12@43.171,94.887 46.732,94.887 R120.1@46.851,94.768 46.851,96.001 47.4,96.55 v1(51.575,96.55) ; v1(51.575,107.125) 51.61,107.16 65.749,107.16 65.784,107.125 v1(74.075,107.125) ; U35.9@72.19,70.849 78.224,70.849 v1@78.275,70.9 ; v1(72.381,109.52) v1(78.455,109.52) v1@78.525,109.45
  Bottom Layer w0.3: v1(51.575,96.55) v1(51.575,107.125) ; v1(72.381,109.52) 72.381,108.569 73.77,107.18 74.13,107.18 v1(74.075,107.125) ; v1(78.2,70.875) 79.575,72.25 79.575,77.354 79.575,108.4 78.475,109.5 v1(78.455,109.52)
13P: DC8.C16 R123.2 U35.6 U47.6 U56.9 | length 239.5
  Top Layer w0.3: U56.9@43.171,91.137 44.737,91.137 v1@44.75,91.15 ; v1(44.975,84.9) 62.525,84.9 v1@62.775,84.65 ; R123.2@58.018,112.418 58.018,111.157 v1(59.574,109.601) 59.605,109.57 U47.6@61.706,109.57 61.706,109.748 U47.6@61.691,109.763 ; v1(62.875,17.2) 64.35,17.2 64.9,16.65 169.1,16.65 172.55,13.2 DC8.C16@172.55,9.625
  Bottom Layer w0.3: v1@44.925,85.1 44.975,85.15 v1(44.975,91.2) ; v1@59.6,84.9 v1@59.6,109.525 ; v1(62.875,17.2) 62.875,64.825 61.516,66.184 v1(61.516,70.899) 62.875,72.258 v1@62.875,84.6
  other v1: 62.75,84.875 59.569,84.931 58.026,112.043
13P_: R119.1 U35.2 U47.2 U56.8 | length 72.8
  Top Layer w0.3: U56.8@43.171,89.887 45.275,89.887 45.531,90.143 v1(46.75,90.143) R119.1@46.826,90.143 ; v1(46.437,75.499) 49.549,75.499 49.949,75.899 v1(61.516,75.899)
  Bottom Layer w0.3: v1@46.469,75.556 46.75,75.837 v1(46.75,90.143) ; v1(61.516,75.899) 61.516,96.366 61.975,96.825 61.975,99.55 61.516,100.009 61.516,109.8 61.706,109.99 v1(61.706,114.57)
14P: DC8.A17 R122.2 U34.13 U46.13 U56.6 | length 281.2
  Top Layer w0.3: U56.6@32.496,91.187 36.862,91.187 v1(37.45,91.775) ; v1(37.45,114.775) U46.13@42.85,114.774 ; v1@37.55,75.8 37.525,75.775 v1(37.525,75.75) 43.143,75.75 U34.13@43.171,75.722 ; v1(39.075,14.225) 43.2,14.225 44.575,15.6 58.525,15.6 63.6,20.675 69.8,20.675 71.275,19.2 114.013,19.2 115.488,20.675 v1(148.85,20.675) ; U46.13@42.85,114.826 45.227,114.826 45.55,114.503 R122.2@46.826,114.503
  Bottom Layer w0.3: v1@37.55,114.875 v1(37.45,114.775) v1(37.45,91.775) 37.45,79.525 37.525,79.45 v1(37.525,75.75) 37.525,23.35 39.075,21.8 v1@39.075,14.524 ; v1(148.85,20.675) 148.85,2.85 150.425,1.275 171.7,1.275 DC8.A17@175.05,4.625
14P_: R118.1 U34.9 U46.9 U56.5 | length 62.5
  Top Layer w0.3: U56.5@32.496,92.437 v1(35.175,92.437) v1@35.437,92.437 ; v1(34.475,70.7) 34.476,70.701 U34.9@43.025,70.701 ; v1@36.175,109.8 v1(36.201,109.826) U46.9@42.85,109.826 ; U46.9@42.917,109.774 44.9,109.774 45.244,110.118 R118.1@46.826,110.118
  Bottom Layer w0.3: v1@34.35,70.675 34.35,86.575 35.2,87.425 35.2,95.131 35.7,95.631 35.7,98.2 35.225,98.675 35.225,108.85 v1(36.201,109.826)
15P: DC8.B17 R121.2 U34.6 U46.6 U56.2 | length 294.7
  Top Layer w0.3: R121.2@27.151,94.318 28.55,94.318 28.807,94.575 29.35,94.575 30.962,96.187 U56.2@32.496,96.187 ; v1(29.425,109.6) 29.701,109.876 U46.6@32.175,109.876 ; v1@29.6,88.615 v1(66.575,88.615) ; v1@31.15,66.825 v1(66.475,66.825) ; v1(66.8,19.425) 67.9,18.325 172.025,18.325 176.275,14.075 176.275,8.35 DC8.B17@175.05,7.125
  Bottom Layer w0.3: v1(29.375,88.7) 29.4,88.725 v1(29.4,94.575) 29.4,109.575 v1(29.425,109.6) ; v1(31.15,66.8) 31.15,68.125 32.3,69.275 v1(32.3,70.75) ; v1@66.475,66.765 v1(66.475,66.825) 66.475,88.165 ; v1@66.5,66.825 66.5,24.8 66.8,24.5 v1(66.8,19.425)
15P_: R117.1 U34.2 U46.2 U56.1 | length 50.1
  Top Layer w0.3: v1(27.299,96.657) 28.395,96.657 29.175,97.437 U56.1@32.496,97.437 v1@34.638,97.437 ; v1(32.174,75.751) U34.2@32.35,75.751 ; U46.2@32.175,114.876 v1(34.4,114.876) ; U34.2@32.35,75.772 U34.2@32.496,75.772
  Bottom Layer w0.3: v1(30.45,97.425) 30.515,97.36 30.515,81.71 32.174,80.051 v1(32.174,75.751) ; v1(34.4,114.876) 34.4,112.875 34.625,112.65 v1(34.625,97.425)
30: C5.1 C6.2 C8.2 C9.2 C10.1 C11.1 C12.1 C13.1 C14.2 C15.1 C16.2 C17.1 C18.2 C26.2 C27.2 C28.2 C30.2 C31.2 C32.2 C34.2 C35.2 D1.1 DC7.A1 DC7.A31 DC7.A32 DC7.B1 DC7.B31 DC7.B32 DC7.C1 DC7.C31 DC7.C32 DC8.A1 DC8.A30 DC8.A31 DC8.A32 DC8.B1 DC8.B30 DC8.B31 DC8.B32 DC8.C1 DC8.C30 DC8.C31 DC8.C32 pad.0 R14.3 R35.2 R36.2 R53.1 R80.1 T1.2 T4.2 U14.10 U14.14 U19.10 U20.10 U21.10 U22.10 U22.12 U23.10 U23.12 U24.3 U24.7 U24.12 U25.10 U26.1 U26.7 U27.4 U27.10 U31.4 U32.8 U32.12 U33.4 U34.3 U34.8 U35.3 U35.8 U36.3 U36.8 U37.3 U37.8 U38.3 U38.8 U39.3 U39.8 U41.4 U42.4 U42.10 U43.8 U45.4 U46.3 U46.8 U47.3 U47.8 U48.3 U48.8 U49.3 U49.8 U50.3 U50.8 U51.3 U51.8 U53.4 U144.4 U144.10 | length 24.9
  Top Layer w0.3: U38.3@147.431,73.061 149.064,73.061 149.55,72.575 149.55,70.1 150.4,69.25 153.875,69.25 155.114,68.011 U38.8@158.106,68.011 ; C31.2@195.825,81.825 v1(195.825,81.875) ; U24.3@204.708,94.27 U24.12@215.333,94.27
  other v1: 22.6,14.7 30.8,17.875 155.125,21.575 46.874,28.307 193.475,39.4 193.35,43.45 42.917,52.446 192.257,59.825 26.625,66.075 157.2,67.9 20.001,75.318 188.25,81.2 77.555,98.114 27.25,99 67.525,99.65 27.2,104.75 27.2,107.375 192.6,108.825 27.196,110.024 27.196,113.072 149.225,113.55 167.375,113.6 25.776,121.093 66.6,124.1 63.925,126.025 50.95,128 117.375,128.875 119.325,130.075 201.191,133.011 114.425,137.425 199.438,137.853 201.125,142.55 201.075,147.25
+3,5V: DC7.A3 DC7.B3 DC7.C3 R31.2 R46.2 U11.3 U11.7 U11.11 U12.3 U12.7 U12.10 U12.11 U54.3 U54.7 U54.10 U54.11 U54.14 U55.3 U55.7 U55.10 U55.11 U55.14 U56.3 U56.7 U56.10 U56.11 U56.14 U57.3 U57.7 U57.10 U57.11 U57.14 U58.3 U58.7 U58.10 U58.11 U58.14 | length 571.3
  Top Layer w0.7: v1(25.075,24.1) 25.119,24.144 60.994,24.144 61.96,25.11 U54.7@61.96,25.77 64.295,25.77 v1(64.3,25.775) ; U56.7@32.496,89.937 v1@38.537,89.937 ; U56.3@32.496,94.937 38.913,94.937 40.213,93.637 U56.11@43.171,93.637 U56.10@43.171,92.387 ; v1(38.938,97.487) 43.147,97.487 43.171,97.463 U56.14@43.271,97.462 ; v1(39.025,104.55) 95.7,104.55 v1(95.9,104.75) 95.925,104.75 97.375,103.3 145.775,103.3 145.925,103.15 v1(152.13,103.15) ; U54.3@61.96,30.77 v1(64.3,30.77) 65.6,29.47 U54.11@72.635,29.47 ; v1(64.3,35.225) 71.85,35.225 72.635,34.44 U54.14@72.635,33.27 ; U54.10@72.635,28.22 U54.11@72.635,29.47 ; U55.7@90.154,25.643 v1(93.975,25.643) ; U57.14@90.154,91.364 95.964,91.364 v1(96,91.4) ; U57.11@90.154,95.164 U57.10@90.154,96.414 v1(95.964,96.414) ; v1(93.85,30.625) 95.132,29.343 U55.11@100.829,29.343 ; v1(96,98.875) 96.011,98.864 U57.7@100.829,98.864 ; v1(96.064,93.864) U57.3@100.829,93.864 ; U55.10@100.829,28.093 U55.11@100.829,29.343 ; U55.14@100.829,33.143 96.418,33.143 93.918,30.643 U55.3@90.154,30.643 87.543,30.643 86.37,29.47 U54.11@72.635,29.47 ; U11.7@118.793,25.643 125.65,25.643 126.032,26.025 126.032,29.343 ; U11.11@129.467,29.343 126.032,29.343 ; U58.7@147.304,89.27 147.384,89.35 v1@151.875,89.35 ; U58.3@147.304,94.27 151.995,94.27 v1(152.05,94.325) ; v1(151.995,91.72) U58.10@157.979,91.72 U58.11@157.979,92.97 ; v1@152.13,96.77 U58.14@157.979,96.77 ; v1(156.35,145.4) 156.4,145.45 v1(167.15,145.45) ; U12.7@161.274,136.26 v1(167.2,136.26) ; U12.3@161.274,141.26 v1(167.1,141.26) 168.4,139.96 U12.11@171.949,139.96 U12.10@171.949,138.71 ; U55.11@100.829,29.343 100.932,29.24 115.59,29.24 116.993,30.643 U11.3@118.793,30.643 125.532,30.643 126.032,30.143 126.032,29.343
  Bottom Layer w0.7: DC7.C3@25.075,9.65 v1(25.075,24.1) ; v1@38.938,90.075 v1(38.938,94.95) v1(38.938,97.487) 38.938,104.458 v1@39.03,104.55 ; v1(45.05,24.125) 45.099,24.076 v1(45.099,20.451) ; v1(64.3,25.775) v1(64.3,30.77) v1(64.3,35.225) ; v1(93.975,25.643) 93.975,30.5 v1(93.85,30.625) 95.075,30.625 96,31.55 v1(96,91.4) v1(96,98.875) 96,104.65 v1(95.9,104.75) 95.9,122.375 94.1,124.175 v1(94.1,127.55) ; v1@151.995,89.645 v1(151.995,91.72) v1(151.995,96.7) ; 152.025,97.2 152.116,97.291 152.116,144.2 153.316,145.4 v1(156.35,145.4) ; v1(167.15,145.45) 167.1,145.4 v1(167.1,141.26) 167.1,136.36 v1(167.2,136.26)
  other v1: 151.8,89.45 38.925,89.925
+5V: DC7.A2 DC7.B2 DC7.C2
+6,3V: DC7.A4 DC7.B4 DC7.C4 R105.1 R106.1 R107.1 R108.1 R113.1 R114.1 R115.1 R116.1 R121.1 R122.1 R123.1 R124.1 R129.1 R130.1 R131.1 R132.1 R137.1 R138.1 R139.1 R140.1 U10.11 U13.11 U14.11 U15.11 U16.11 U18.11 U19.11 U20.11 U21.11 U22.11 U23.11 U24.11 U25.11 U26.11 U28.11 U29.11 U32.11 U34.11 U35.11 U36.11 U37.11 U38.11 U39.11 U43.11 U46.11 U47.11 U48.11 U49.11 U50.11 U51.11 | length 1077.4
  Top Layer w0.5: v1(154.582,56.343) 168.918,56.343 R114.1@169.55,56.975
  Top Layer w0.7: v1(23.75,101.5) 23.85,101.4 v1(40.675,101.4) ; v1(27.6,15.7) v1@40.575,15.7 ; v1(40.574,112.274) 48.65,112.274 ; v1(40.574,120.349) v1(69.575,120.349) 69.649,120.275 98.351,120.275 v1(98.425,120.349) 126.976,120.349 v1(127.075,120.25) 127.1,120.275 v1@154.525,120.275 ; v1(40.603,73.222) U34.11@43.171,73.222 ; v1(40.7,53.675) 40.72,53.695 U25.11@42.917,53.695 44.8,53.695 45.661,52.834 v1(46.451,52.834) ; v1(40.793,29.343) U19.11@43.171,29.343 ; v1(48.726,114.503) 48.726,112.35 48.65,112.274 ; R123.1@56.1,112.274 48.65,112.274 ; v1(69.525,73.325) 69.549,73.349 U35.11@72.19,73.349 ; v1(69.575,111.95) 69.645,112.02 U47.11@72.381,112.02 77.654,112.02 ; v1(69.606,94.494) U14.11@71.619,94.494 ; v1@69.822,53.822 77.222,53.822 78.162,54.762 R116.1@78.162,56.21 ; R124.1@77.654,113.995 77.654,112.02 ; R131.1@84.451,112.293 84.178,112.02 77.654,112.02 ; v1(98.372,73.603) U37.11@100.829,73.603 ; v1(98.4,112.4) 98.401,112.401 U49.11@100.575,112.401 100.617,112.443 106.15,112.443 ; v1(98.425,52.325) 98.576,52.476 U28.11@100.95,52.476 105.75,52.476 106.117,52.843 R107.1@112.476,52.843 ; R132.1@106.102,114.503 106.102,112.491 106.15,112.443 ; v1(113.251,112.318) 108.925,112.318 108.8,112.443 106.15,112.443 ; v1@126.776,120.35 v1@127.125,120.35 ; v1(126.975,52.575) 126.984,52.584 U29.11@129.912,52.584 ; v1(127.1,112.4) 127.101,112.401 U48.11@129.213,112.401 ; v1@127.211,71.761 U36.11@129.467,71.761 ; v1@127.27,92.97 U16.11@129.467,92.97 134.53,92.97 135.875,91.625 R113.1@135.875,90.373 ; U48.11@129.3,112.401 135.025,112.401 135.124,112.5 ; v1(135.124,114.282) 135.124,112.5 ; R137.1@140.376,110.493 135.507,110.493 135.124,110.876 135.124,112.5 ; U39.11@149.597,139.96 154.115,139.96 v1(155.51,138.565) ; v1@154.475,112.375 154.501,112.401 v1(154.7,112.401) U50.11@157.852,112.401 163.1,112.401 ; v1(154.55,51.441) U13.11@157.85,51.441 ; v1(154.575,71.6) 154.736,71.761 U38.11@158.106,71.761 ; v1(154.575,120.225) 154.6,120.25 158.45,120.25 160.3,122.1 183.125,122.1 v1(183.175,122.15) ; v1@154.632,29.343 U10.11@158.106,29.343 ; R138.1@163.249,114.132 163.249,112.55 163.1,112.401 ; R139.1@170.226,112.293 170.118,112.401 163.1,112.401 ; v1(183.175,29.225) 183.293,29.343 U15.11@186.744,29.343 ; v1(183.175,71.75) 183.186,71.761 U20.11@186.744,71.761 ; v1(183.175,93.125) U21.11@186.724,93.125 ; v1(183.225,18.725) 211.644,18.725 v1@211.65,18.719 ; v1@183.226,112.401 U51.11@186.49,112.401 191.151,112.401 191.899,113.149 R140.1@191.899,114.907 ; v1@183.341,51.441 U18.11@186.49,51.441 ; v1(211.65,71.75) 211.661,71.761 U43.11@215.383,71.761 ; v1(211.65,92.95) 211.67,92.97 U24.11@215.383,92.97 ; v1(211.65,112.525) 211.774,112.401 U23.11@215.129,112.401 ; v1@211.72,29.47 U22.11@215.383,29.47 ; v1@211.816,51.441 U32.11@215.129,51.441
  Bottom Layer w0.7: v1(23.75,101.5) 23.75,95.575 25.007,94.318 v1(25.251,94.318) ; DC7.C4@27.55,9.65 27.55,15.65 v1(27.6,15.7) ; v1(40.574,112.274) v1(40.574,120.349) ; v1@40.675,112.4 v1(40.675,101.4) 40.793,101.282 v1(40.793,29.343) v1@40.793,15.868 ; v1(54.326,100.943) v1(54.326,112.226) ; v1(69.575,53.85) v1(69.575,111.95) v1(69.575,120.349) ; v1(98.425,52.325) v1(98.425,120.349) ; v1(112.584,95.639) 112.5,96.123 112.5,111.567 v1(113.251,112.318) ; v1@126.825,52.625 127.1,52.9 v1(127.1,92.8) v1(127.1,112.4) 127.1,120.225 v1(127.075,120.25) ; v1@154.575,29.35 154.575,51.441 v1(154.575,71.6) v1(154.575,120.225) 155.51,121.16 v1(155.51,138.565) ; v1(183.175,122.15) v1(183.175,112.35) v1(183.175,93.125) v1(183.175,71.75) v1(183.175,51.275) v1(183.175,29.225) 183.175,18.775 v1(183.225,18.725) ; v1@211.6,112.575 v1(211.65,112.525) v1(211.65,92.95) v1(211.65,71.75) v1(211.65,29.4) v1(211.65,18.75)
  other v1: 40.8,15.725 154.625,29.35 211.625,51.425 127,71.675 135.85,90.325 84.426,112.143 77.624,114.182